# Altium PCB STM32C0_ST25R100_EVK.PcbDoc
Units mm, origin at the board's own origin, x right, y up, seen from the top; angles counter-clockwise.
Board outline 89.92 x 31.24 mm, 2 copper layers (Top Layer, Bottom Layer); 84 components, 80 nets, 289 pads, 224 vias.
Unrouted connection lines stored in the file: 1.
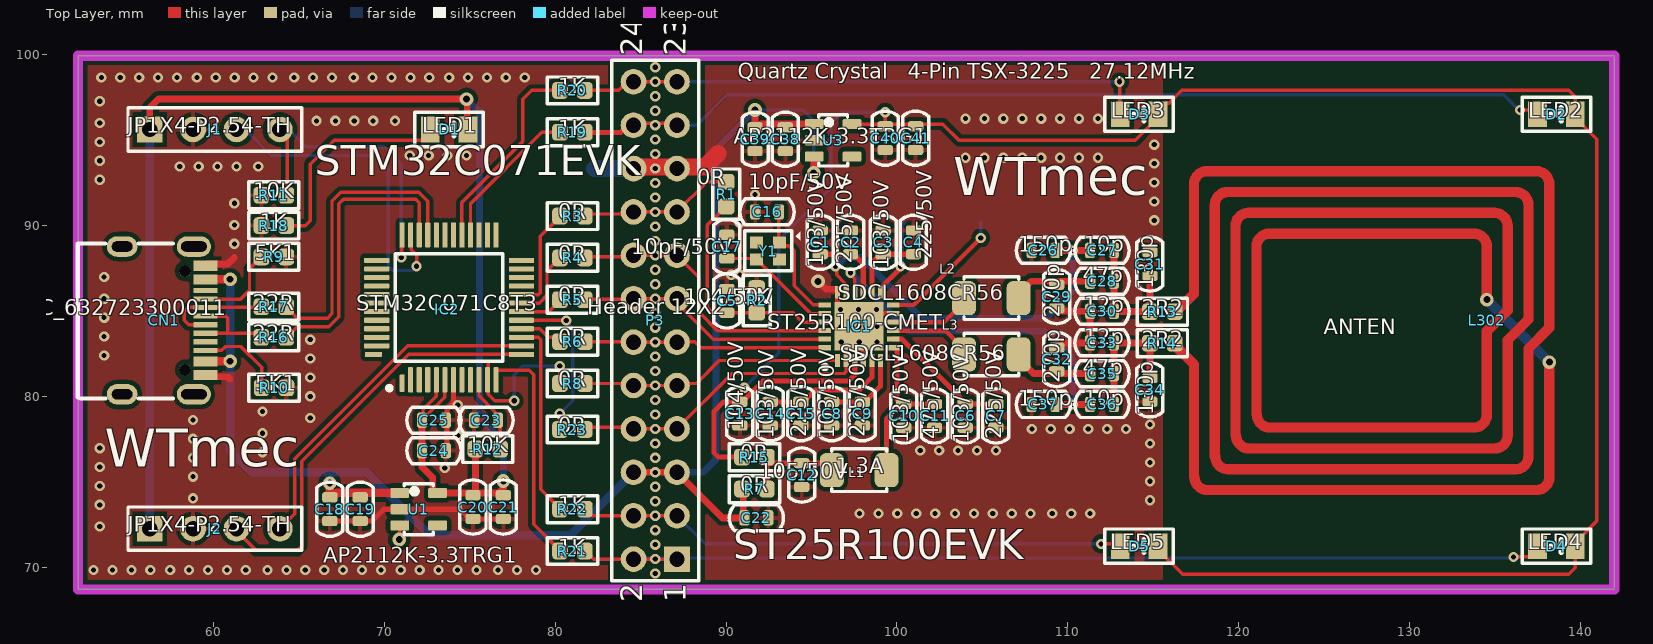
[diagram p0: Top Layer view]
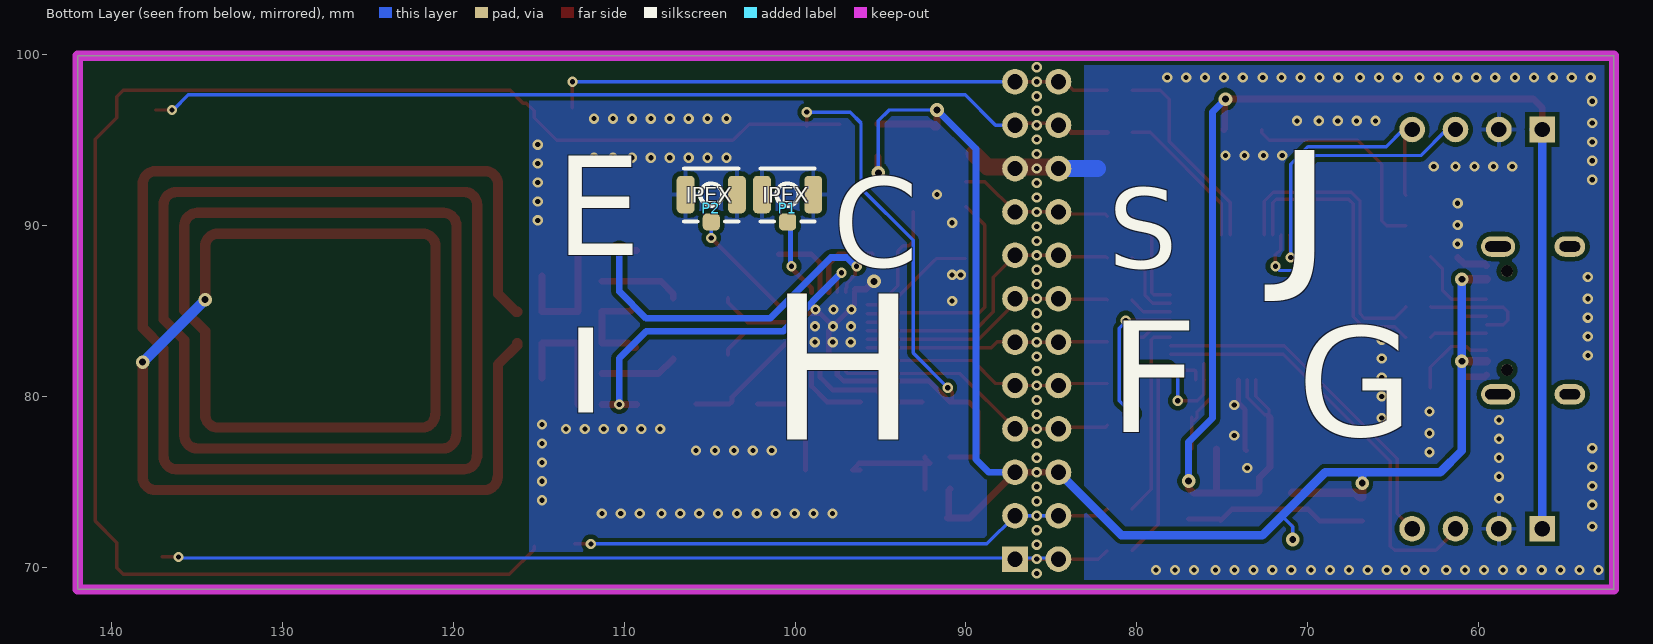
[diagram p1: Bottom Layer view, seen from below]
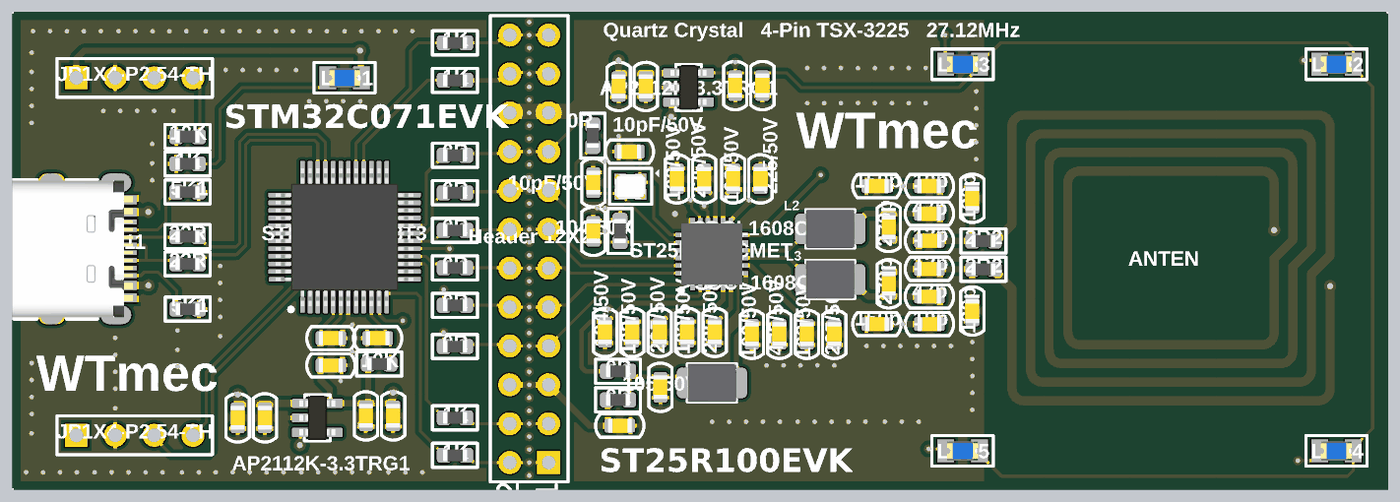
[diagram p2: 3D render of the assembled board from above, using the file's embedded part models]

## Layer stack, top to bottom
Top Solder: solder mask 0.0102, Solder Resist, Dk 3.5
Top Layer: signal copper 0.0356
Dielectric 1: dielectric 0.32, FR-4, Dk 4.8
Bottom Layer: signal copper 0.0356
Bottom Solder: solder mask 0.0102, Solder Resist, Dk 3.5

## Board outline
52.07,68.707 141.986,68.707 141.986,99.949 52.07,99.949

## Design rules (kind name [scope] priority, off if disabled: settings)
Clearance [All] p1: gap=0.254 ignorepadtopadclearanceinfootprint=FALSE except(0: Arc-Hole Track-Hole SMDPad-Hole THPad-Hole Via-Hole Fill-Hole Poly-Hole Region-Hole Text-Hole; 0.2: Arc-Arc Arc-Track Arc-SMDPad Track-Track Track-SMDPad)
PolygonConnect [All] p1: thpad.connectstyle=Relief thpad.reliefconductorwidth=0.254 thpad.reliefentries=4 thpad.polygonreliefangle="90 Angle" thpad.airgapwidth=0.254 smdpad.connectstyle=Relief smdpad.reliefconductorwidth=0.254 smdpad.reliefentries=4 smdpad.polygonreliefangle="90 Angle" smdpad.airgapwidth=0.254 via.connectstyle=Direct via.reliefconductorwidth=0.254 via.reliefentries=4 via.polygonreliefangle="90 Angle" via.airgapwidth=0.254
RoutingVias [All] p1: holewidth=0.711 width=1.27 viastyle="Through Hole" minholewidth=0.711 minwidth=1.27 maxholewidth=0.711 maxwidth=1.27
SolderMaskExpansion [All] p1: expansion=0.102 istentingtop=FALSE
Width [All] p1: maxlimit=2 minlimit=0.2 preferedwidth=0.254
30 further rules are at their usual default settings.

## Classes and differential pairs
component class Reader: C1 C2 C3 C4 C5 C6 C7 C8 C9 C10 C11 C12 C13 C14 C15 C16 C17 C38 C39 C40 C41 IC1 IP IP1 L1 P1 P2 R1 R2 R7 R15 U2 U3 Y1
component class MCU: C18 C19 C20 C21 C22 C23 C24 C25 CN1 D1 D2 D3 D4 D5 IC2 J1 J2 P3 R3 R4 R5 R6 R8 R9 R10 R11 R12 R16 R17 R18 R19 R20 R21 R22 R23 U1 U2
component class ANT: C26 C27 C28 C29 C30 C31 C32 C33 C34 C35 C36 C37 con1 L2 L3 R13 R14

## Components (designator, comment, footprint, x,y, rotation, side; value= is the part's Value field where it differs from the comment)
C1 "103/50V" CAP_CERAMIC_0603(1608mm) 95.504,89.027 r270 top value=33p
C2 "225/50V" CAP_CERAMIC_0603(1608mm) 97.282,89.027 r270 top value=33p
C3 "103/50V" CAP_CERAMIC_0603(1608mm) 99.187,89.027 r270 top value=33p
C4 "225/50V" CAP_CERAMIC_0603(1608mm) 100.965,89.027 r270 top value=33p
C5 "104/50V" CAP_CERAMIC_0603(1608mm) 90.043,85.598 r90 top value=33p
C6 "103/50V" CAP_CERAMIC_0603(1608mm) 103.995,78.867 r90 top value=33p
C7 "225/50V" CAP_CERAMIC_0603(1608mm) 105.791,78.867 r90 top value=33p
C8 "103/50V" CAP_CERAMIC_0603(1608mm) 96.175,78.994 r90 top value=33p
C9 "225/50V" CAP_CERAMIC_0603(1608mm) 97.971,78.994 r90 top value=33p
C10 "103/50V" CAP_CERAMIC_0603(1608mm) 100.403,78.867 r90 top value=33p
C11 "475/50V" CAP_CERAMIC_0603(1608mm) 102.199,78.867 r90 top value=33p
C12 "105/50V" CAP_CERAMIC_0603(1608mm) 94.426,75.404 r90 top value=33p
C13 "104/50V" CAP_CERAMIC_0603(1608mm) 90.805,78.994 r90 top value=33p
C14 "103/50V" CAP_CERAMIC_0603(1608mm) 92.583,78.994 r90 top value=33p
C15 "225/50V" CAP_CERAMIC_0603(1608mm) 94.379,78.994 r90 top value=33p
C16 "10pF/50V" CAP_CERAMIC_0603(1608mm) 92.396,90.805 r180 top
C17 "10pF/50V" CAP_CERAMIC_0603(1608mm) 90.043,88.773 r90 top
C18 "Capacitor" CAP_CERAMIC_0603(1608mm) 66.802,73.406 r90 top value=100pF
C19 "Capacitor" CAP_CERAMIC_0603(1608mm) 68.58,73.406 r90 top value=100pF
C20 "Capacitor" CAP_CERAMIC_0603(1608mm) 75.184,73.533 r90 top value=100pF
C21 "Capacitor" CAP_CERAMIC_0603(1608mm) 76.962,73.533 r90 top value=100pF
C22 "Capacitor" CAP_CERAMIC_0603(1608mm) 91.769,72.898 r0 top value=100pF
C23 "Capacitor" CAP_CERAMIC_0603(1608mm) 75.946,78.613 r0 top value=100pF
C24 "Capacitor" CAP_CERAMIC_0603(1608mm) 72.898,76.835 r180 top value=100pF
C25 "Capacitor" CAP_CERAMIC_0603(1608mm) 72.898,78.613 r180 top value=100pF
C26 "150p" CAP_CERAMIC_0603(1608mm) 108.573,88.553 r180 top
C27 "10p" CAP_CERAMIC_0603(1608mm) 112.002,88.553 r180 top
C28 "47p" CAP_CERAMIC_0603(1608mm) 112.002,86.75 r180 top
C29 "270p" CAP_CERAMIC_0603(1608mm) 109.347,85.852 r90 top
C30 "12p" CAP_CERAMIC_0603(1608mm) 112.002,84.988 r0 top
C31 "130p" CAP_CERAMIC_0603(1608mm) 114.808,87.757 r270 top
C32 "270p" CAP_CERAMIC_0603(1608mm) 109.347,82.169 r90 top
C33 "12p" CAP_CERAMIC_0603(1608mm) 112.002,83.143 r180 top
C34 "130p" CAP_CERAMIC_0603(1608mm) 114.808,80.391 r270 top
C35 "47p" CAP_CERAMIC_0603(1608mm) 112.002,81.34 r180 top
C36 "10p" CAP_CERAMIC_0603(1608mm) 112.002,79.536 r0 top
C37 "150p" CAP_CERAMIC_0603(1608mm) 108.573,79.536 r0 top
C38 "Capacitor" CAP_CERAMIC_0603(1608mm) 93.472,95.063 r90 top value=100pF
C39 "Capacitor" CAP_CERAMIC_0603(1608mm) 91.694,95.063 r90 top value=100pF
C40 "Capacitor" CAP_CERAMIC_0603(1608mm) 99.314,95.123 r90 top value=100pF
C41 "Capacitor" CAP_CERAMIC_0603(1608mm) 101.092,95.123 r90 top value=100pF
CN1 "USB_C_632723300011" USB-C-SMD_TYPE-C-6PIN-2MD-073 57.023,84.455 r270 top locked
D1 "LED1" LED_0805_BLUE 73.787,95.631 r180 top
D2 "LED2" LED_0805_BLUE 138.6,96.52 r180 top
D3 "LED3" LED_0805_BLUE 114.173,96.52 r180 top
D4 "LED4" LED_0805_BLUE 138.6,71.247 r180 top
D5 "LED5" LED_0805_BLUE 114.173,71.247 r180 top
IC1 "ST25R100-CMET" QFN50P400X400X60-25N-D 97.778,84.108 r90 top locked
IC2 "STM32C071C8T3" QFP50P900X900X160-48N 73.787,85.217 r90 top locked
J1 "JP1X4-P2.54-TH" HDR1X4 56.261,95.631 r0 top locked
J2 "JP1X4-P2.54-TH" HDR1X4 56.261,72.263 r0 top locked
L1 "1.3A" "Inductor 1210 (3225)" 97.79,75.692 r180 top value="120 Ohms @ 100 MHz"
L2 "SDCL1608CR56" "Inductor 1210 (3225)" 105.525,85.759 r180 top value=560nH
L3 "SDCL1608CR56" "Inductor 1210 (3225)" 105.525,82.457 r180 top value=560nH
L302 "ANTEN" "PCB ANTEN RFID, 13.56MHZ, 420NH, 20X20 MM" 134.529,84.474 r270 top value=420nH
P1 "IPEX" "IPEX SMD" 100.428,90.242 r270 bottom value=IPEX_GPS
P2 "IPEX" "IPEX SMD" 104.897,90.242 r270 bottom value=IPEX_GPS
P3 "Header 12X2" HDR2X12 87.122,70.485 r90 top locked
R1 "0R" RES_0603(1608) 90.17,91.948 r270 top
R2 "1K" RES_0603(1608) 91.948,85.725 r270 top
R3 "0R" RES_0603(1608) 80.899,90.726 r0 top
R4 "0R" RES_0603(1608) 80.899,88.275 r0 top
R5 "0R" RES_0603(1608) 80.899,85.825 r0 top
R6 "0R" RES_0603(1608) 80.899,83.374 r0 top
R7 "0R" RES_0603(1608) 91.759,74.422 r180 top
R8 "0R" RES_0603(1608) 80.899,80.923 r0 top
R9 "5K1" RES_0603(1608) 63.627,88.011 r180 top
R10 "5K1" RES_0603(1608) 63.639,80.357 r180 top
R11 "10K" RES_0603(1608) 63.424,91.948 r0 top
R12 "10K" RES_0603(1608) 75.946,77.089 r0 top
R13 "2R2" RES_0603(1608) 115.431,85.124 r0 top
R14 "2R2" RES_0603(1608) 115.431,83.279 r0 top
R15 "0R" RES_0603(1608) 91.759,76.293 r180 top
R16 "22R" RES_0603(1608) 63.627,83.312 r180 top value=5K1
R17 "22R" RES_0603(1608) 63.627,85.09 r180 top value=5K1
R18 "1K" RES_0603(1608) 63.424,90.17 r0 top
R19 "1K" RES_0603(1608) 80.899,95.628 r0 top
R20 "1K" RES_0603(1608) 80.899,98.078 r0 top
R21 "1K" RES_0603(1608) 80.899,71.12 r0 top
R22 "1K" RES_0603(1608) 80.899,73.571 r0 top
R23 "0R" RES_0603(1608) 80.899,78.232 r0 top
U1 "AP2112K-3.3TRG1" SOT23-5 72.009,73.406 r270 top
U3 "AP2112K-3.3TRG1" SOT23-5 96.266,94.996 r270 top
Y1 "Quartz Crystal   4-Pin TSX-3225   27.12MHz" "CRYSTAL-XRCGB27M120F3M10R0 (2x1.6)" 92.456,88.519 r180 top value=27.12MHz

## Footprints (in the part's own frame and the unit in brackets; to place one, negate y for a bottom-side part, rotate by r counter-clockwise, add the part's x,y. Pads: shape width x height; smd on the part's side, far side on the other; paste and mask are expansions set on the pad)
CAP_CERAMIC_0603(1608mm) [mm] "Chip Capacitor, Body 1.6x0.8mm, IPC High Density"
  rrect49% 0.6x0.9 smd: 1(-0.695,0) 2(0.695,0)
  silkscreen extent -1.59,-0.76 1.59,0.76, body extent -0.79,-0.47 0.81,0.48, height 0.81
"CRYSTAL-XRCGB27M120F3M10R0 (2x1.6)" [mm] "Crystal 2x1.6mm"
  rect 0.75x0.7 smd: 1(-0.675,-0.5) 2(0.675,-0.5) 3(0.675,0.5) 4(-0.675,0.5)
  silkscreen extent -1.88,-1.19 1.36,1.15, body extent -1,-0.8 1,0.8, height 0.65
HDR1X4 [mm] "Connector; Header; 4 Position"
  rect 1.5x1.5 hole 0.9: 1(0,0)
  round 1.5 hole 0.9: 2(2.54,0) 3(5.08,0) 4(7.62,0)
  silkscreen extent -1.27,-1.27 8.89,1.27
HDR2X12 [mm] "Connector; Header; 12x2 Position"
  rect 1.5x1.5 hole 0.9: 1(0,0)
  round 1.5 hole 0.9: 2(0,2.54) 3(2.54,0) 4(2.54,2.54) 5(5.08,0) 6(5.08,2.54) 7(7.62,0) 8(7.62,2.54) 9(10.16,0) 10(10.16,2.54) 11(12.7,0) 12(12.7,2.54) 13(15.24,0) 14(15.24,2.54) 15(17.78,0) 16(17.78,2.54) 17(20.32,0) 18(20.32,2.54) 19(22.86,0) 20(22.86,2.54) 21(25.4,0) 22(25.4,2.54) 23(27.94,0) 24(27.94,2.54)
  silkscreen extent -1.27,-1.27 29.21,3.81
"Inductor 1210 (3225)" [mm]
  rrect50% 1.4x2 smd: 1(-1.6,0) 2(1.6,0)
  silkscreen extent -1.6,-1.25 1.6,1.25, body extent -1.6,-1.25 1.6,1.25, height 1.91
"IPEX SMD" [mm] "IPEX Connector SMD"
  round 0.5 on Bottom Overlay: 1(-1.579,-0.005)
  rrect50% 1x1 smd: 1(0.021,-0.005)
  rrect50% 2.2x1.05 smd: 2(-1.579,1.495) 3(-1.579,-1.505)
  silkscreen extent -3.1,-1.58 0,1.57, body extent -3.09,-1.51 0.01,1.49, height 1.25
LED_0805_BLUE [mm] "Chip Resistor; Body 2.0 x 1.3 mm (LxW typ)"
  rect 1.1x1.5 smd: 1(-1.1,0) 2(1.1,0)
  silkscreen extent -2,-1 2,1, body extent -1.01,-0.63 1.01,0.63, height 1.1
"PCB ANTEN RFID, 13.56MHZ, 420NH, 20X20 MM" [mm] "PCB Anten RFID, 13.56MHz, 420nH, 20x20 mm"
  Top Layer lines w0.6: 1.357,-18.271 1.469,-18.271 2.595,-17.145 9.188,-17.145 ; -0.489,-18.271 -0.489,-18.197 -1.541,-17.145 -7.956,-17.145 cw(c-7.956,-16.383) -8.718,-16.383 ; 9.188,-17.117 ccw(c9.188,-16.354) 9.951,-16.358 ; 9.951,-16.361 ccw(c9.189,-16.358) 9.951,-16.358 ; -8.718,-16.3 -8.718,2.896 ; 7.969,-15.926 -6.737,-15.926 cw(c-6.737,-15.164) -7.499,-15.167 ; 7.969,-15.9 ccw(c7.969,-15.138) 8.731,-15.141 ; 6.75,-14.707 -5.518,-14.707 cw(c-5.518,-13.945) -6.28,-13.948 ; 6.75,-14.681 ccw(c6.75,-13.919) 7.512,-13.922 ; 5.531,-13.487 -4.299,-13.487 cw(c-4.299,-12.725) -5.061,-12.725 ; 5.531,-13.462 ccw(c5.531,-12.7) 6.293,-12.703 ; -5.061,-12.8 -5.061,-12.725 ; 6.293,-0.737 6.293,-0.762 ; -1.2,0 -4.248,0 ; -4.299,0 ccw(c-4.299,-0.762) -5.061,-0.762 -5.061,-12.725 ; 7.512,0.483 7.512,0.457 ; 6.75,1.219 cw(c6.75,0.457) 7.512,0.457 ; 6.6,1.219 1.162,1.219 -0.057,2.438 -6.661,2.438 ; -5.391,1.219 -0.565,1.219 0.654,0 5.531,0 cw(c5.531,-0.762) 6.293,-0.762 ; -5.493,1.219 ccw(c-5.493,0.432) -6.28,0.432 -6.28,-13.945 ; 8.731,1.702 8.731,1.676 ; 7.969,2.438 cw(c7.969,1.676) 8.731,1.676 ; 7.944,2.438 1.67,2.438 0.451,3.658 -7.931,3.658 ; -6.737,2.438 ccw(c-6.737,1.676) -7.499,1.676 -7.499,-15.164 ; 9.951,2.921 9.951,2.896 ; 9.214,3.658 9.189,3.658 ; 2.458,3.658 9.189,3.658 ; -7.956,3.658 ccw(c-7.956,2.896) -8.718,2.896 ; 9.951,-16.358 9.951,-16.358 ; 9.951,-16.358 9.951,-16.358 ; 9.951,-16.358 9.951,-16.358 ; 9.951,-16.358 9.951,-16.358 ; 9.951,-16.358 9.951,-16.358 ; 9.951,-16.358 9.951,-16.358 ; 9.951,-16.358 9.951,-16.358 ; 9.951,-16.358 9.951,-16.358 ; 9.951,-16.358 9.951,-16.358 ; 9.951,-16.358 9.951,2.896 ; -7.499,-15.167 cw(c-6.737,-15.164) -7.499,-15.164 ; -7.499,-15.167 -7.499,-15.164 ; 8.731,-15.141 ccw(c7.969,-15.138) 8.731,-15.138 ; 8.731,-15.141 8.731,-15.138 ; 8.731,-15.138 8.731,1.676 ; -6.28,-13.948 cw(c-5.518,-13.945) -6.28,-13.945 ; -6.28,-13.948 -6.28,-13.945 ; 7.512,-13.922 ccw(c6.75,-13.919) 7.512,-13.919 ; 7.512,-13.922 7.512,-13.919 ; 7.512,-13.919 7.512,0.457 ; 6.293,-12.703 ccw(c5.531,-12.7) 6.293,-12.7 ; 6.293,-12.703 6.293,-12.7 ; 6.293,-12.7 6.293,-0.762 ; 9.951,2.896 ccw(c9.189,2.896) 9.189,3.658 ; -8.718,2.896 -8.718,2.896
  Bottom Layer lines w0.6: -1.2,0 2.458,3.658
QFN50P400X400X60-25N-D [mm]
  rect 0.75x0.3 smd: 1(-2,1.25) 2(-2,0.75) 3(-2,0.25) 4(-2,-0.25) 5(-2,-0.75) 6(-2,-1.25) 13(2,-1.25) 14(2,-0.75) 15(2,-0.25) 16(2,0.25) 17(2,0.75) 18(2,1.25)
  rect 0.3x0.75 smd: 7(-1.25,-2) 8(-0.75,-2) 9(-0.25,-2) 10(0.25,-2) 11(0.75,-2) 12(1.25,-2) 19(1.25,2) 20(0.75,2) 21(0.25,2) 22(-0.25,2) 23(-0.75,2) 24(-1.25,2)
  rect 2.85x2.85 smd: 25(0,0)
  silkscreen extent -2.5,1.88 -2.25,2.12, body extent -2.05,-2.05 2.05,2.05, height 0.6
QFP50P900X900X160-48N [mm]
  rrect30% 1x0.3 smd: 1(-4.438,2.75)
  rrect30% 1.475x0.3 smd: 2(-4.238,2.25) 3(-4.238,1.75) 4(-4.238,1.25) 5(-4.238,0.75) 6(-4.238,0.25) 7(-4.238,-0.25) 8(-4.238,-0.75) 9(-4.238,-1.25) 10(-4.238,-1.75) 11(-4.238,-2.25) 12(-4.238,-2.75) 25(4.238,-2.75) 26(4.238,-2.25) 27(4.238,-1.75) 28(4.238,-1.25) 29(4.238,-0.75) 30(4.238,-0.25) 31(4.238,0.25) 32(4.238,0.75) 33(4.238,1.25) 34(4.238,1.75) 35(4.238,2.25) 36(4.238,2.75)
  rrect30% 0.3x1.475 smd: 13(-2.75,-4.238) 14(-2.25,-4.238) 15(-1.75,-4.238) 16(-1.25,-4.238) 17(-0.75,-4.238) 18(-0.25,-4.238) 19(0.25,-4.238) 20(0.75,-4.238) 21(1.25,-4.238) 22(1.75,-4.238) 23(2.25,-4.238) 24(2.75,-4.238) 37(2.75,4.238) 38(2.25,4.238) 39(1.75,4.238) 40(1.25,4.238) 41(0.75,4.238) 42(0.25,4.238) 43(-0.25,4.238) 44(-0.75,4.238) 45(-1.25,4.238) 46(-1.75,4.238) 47(-2.25,4.238)
  rrect30% 0.3x1 smd: 48(-2.75,4.438)
  silkscreen extent -4.85,-3.15 3.15,3.62, body extent -4.5,-4.5 4.5,4.5, height 1.41
RES_0603(1608) [mm] "Chip Inductor, Body 0.6x0.3mm, IPC High Density"
  rrect50% 0.92x0.98 smd: 1(-0.623,-0.161) 2(0.827,-0.161)
  silkscreen extent -1.37,-0.95 1.57,0.63, body extent -0.7,-0.56 0.9,0.24, height 0.56
SOT23-5 [mm]
  rrect30% 0.6x1.1 smd: 1(-0.95,-1.11) 2(0,-1.11) 3(0.95,-1.11) 4(0.95,1.1) 5(-0.95,1.1)
  silkscreen extent -1.5,-0.85 1.5,0.85, body extent -1.46,-1.17 1.46,1.17, height 1
USB-C-SMD_TYPE-C-6PIN-2MD-073 [mm]
  rect 0.6x1.4 smd: 1(-3.2,2.502) 2(-2.4,2.502) 11(2.4,2.502) 12(3.2,2.502)
  rect 0.3x1.4 smd: 3(-1.75,2.502) 4(-1.25,2.502) 5(-0.75,2.502) 6(-0.25,2.502) 7(0.25,2.502) 8(0.75,2.502) 9(1.25,2.502) 10(1.75,2.502)
  oval 1.2x2 hole 0.6 slot 1.5 at 90 deg: 13(-4.325,1.825) 14(4.325,1.825)
  oval 1.2x1.8 hole 0.6 slot 1.2 at 90 deg: 13(-4.325,-2.375) 14(4.325,-2.375)
  round 0.7 hole 0.7 unplated: ""(-2.89,1.305) ""(2.89,1.305)
  silkscreen extent -4.5,-4.97 4.57,0.6, body extent -4.47,-4.95 4.48,2.95, height 3.16

## Part data
C1 C2 C3 C4 C5 C6 C7 C8 C9 C10 C11 C12 C13 C14 C15 C26 C27 C28 C29 C30 C31 C32 C33 C34 C35 C36 C37: library part C0603, "Capacitor Ceramic SMD 0603(1608)"
  C1 C2 C3 C4 C5 C6 C7 C8 C9 C10 C11 C12 C13 C14 C15: LatestRevisionDate=17-Jul-2002, LatestRevisionNote="Re-released for DXP Platform.", PackageReference=RAD-0.3, Published=8-Jun-2000, Publisher="Altium Limited"
  C26 C27 C28 C29 C30 C31 C32 C33 C34 C35 C36 C37: PackageReference=0603
C16 C17: library part CC0603JRNPO9BN100, "CAP CER 10PF 50V 5% COG/NPO 0603", MFR=TDK, Package=0603, Part Number=CC0603JRNPO9BN100, SOLD=SMT
C18 C19 C20 C21 C22 C23 C24 C25 C38 C39 C40 C41: library part MCD-00205, "Capacitor, MLCC, 100pF, 50V, NPO, +/-5%, 0402, T=0.5mm", Manufacturer=YAGEO, Manufacturer_Part_Number=CC0402JRNPO9BN101, Package=0402, Component_Country_Of_Origin=China, ComponentLink1URL=http://tunmcdsvn.tun.st.com/Component_Documentation_Library/Trunk/Capacitor/YAGEO_NP0_Series, ID=2658, Internal_Part_Number=MCD-00205, Order_Code_Digikey=311-1024-1-ND, Order_Code_Farnell=3019226RL, Order_Code_RS=N/A, Part_Preference=Recommended, Part_Type=Capacitor, ShowFields=YES, Status=Released
CN1: library part MCD-02273, "Connector_USB_TypeC, 24pins, RA, TH, T=1.9mm (USB certified)", Manufacturer="WURTH ELEKTRONIK", Manufacturer_Part_Number=632723300011, Component_Country_Of_Origin=China, ComponentLink1URL=http://tunmcdsvn.tun.st.com/Component_Datasheet_Library/Trunk/Connectors/WURTH_ELEKTRONIK_USB_TYPE-C_632723300011, ID=4373, Internal_Part_Number=MCD-02273, Order_Code_Digikey=732-9618-1-ND, Order_Code_Farnell=2984404, Order_Code_RS=N/A, Part_Preference=Recommended, Part_Type=Connector, ShowFields=YES, Status=Released
D1: library part LED_Gr, "LED 0805 GREEN 6.3MCD GAP ON GAP", Package=0805
D2 D3 D4 D5: library part LED_BLUE, "LED 3MM HI EFF BLUE DIFF", MFR="Vishay Semiconductor Opto Division", Package=Pitch:3mm, Part Number=TLHB4400, Vender=Digikey, Vender Part=751-1092-ND
IC1: "Integrated Circuit", Manufacturer_Name=STMicroelectronics, Mouser Part Number=511-ST25R100-CMET, Datasheet Link=https://www.st.com/resource/en/datasheet/st25r100.pdf, Height=0.6mm, Manufacturer_Part_Number=ST25R100-CMET, Mouser Price/Stock=https://www.mouser.co.uk/ProductDetail/STMicroelectronics/ST25R100-CMET?qs=HoCaDK9Nz5cyKRkjt%2FIQ%2Fw%3D%3D
IC2: "Integrated Circuit", Manufacturer_Name=STMicroelectronics, Datasheet Link=https://www.st.com/resource/en/datasheet/stm32c071c8.pdf, Height=1.6mm, Manufacturer_Part_Number=STM32C071C8T3
J1 J2: "Pin Header Single Row 2.54MM 4P - Through Hole"
L1: library part IND, "IND-FIXED 0603", MPN=BLM15PD121SN1D, Solder=SMT
L2 L3: library part "L 0603 100n", "SMD 0603   Multilayer High frequency Inductor   560 nH   100 mA   1 Ω Max   (Ex SDCL1608CR56JTDF...)", Manufacturer="Shenzhen Sunlord Electronics Co., Ltd", Package=0603, Package-mm=1608, PartNumber="SDCL1608CR56JTDF, SWEL1608CR56JT", Temperature Range="-55°C ~ +125°C", Tolerance %=±5%, ComponentLink1Description="Datasheet link", ComponentLink1URL=https://store.comet.bg/download-file.php?id=1927, DCR=1Ω, Imax=300mA, Ind=560nH, Material=Ferrite, Mount Type=SMT, Publisher=Hefest, Q@100MHz=65, S.R.F.=1400MHz, Supplier 1=Comet, Technology=Chip, Type=Inductors
L302: library part Inductor, "Inductor", Code_IEC=1005, Code_JEITA=0402, LatestRevisionDate=29-May-2009, LatestRevisionNote="IPC-7351 Footprint Added.", PackageDescription="Chip Inductor", PackageReference=0402-A, Published=8-Jun-2000, Publisher="Altium Limited"
P1 P2: library part LTI-IPXSM66AL, "IPX/U.FL Surface Mount Mating Receptacle", CompanyID=VT-01357, MPN=LTI-IPXSM66AL, Solder=SMT
P3: "Header, 12-Pin, Dual row", LatestRevisionDate=17-Jul-2002, LatestRevisionNote="Re-released for DXP Platform.", Publisher="Altium Limited"
R1 R3 R4 R5 R6 R7 R8 R9 R10 R11 R12 R13 R14 R15 R16 R17 R23: library part R0603, "Resistor SMD 0603(1608)", MPN=RC0603FR-070RL, Package=0603
R2 R18 R19 R20 R21 R22: library part RC0603FR-0710KL, "RES SMD 10K OHM 1% 1/10W 0603", MPN=RC0603FR-0710KL, Solder=SMT
U1 U3: "IC REG LDO 3.3V 0.6A SOT25", CompanyID=VT-01101, MPN=AP2112K-3.3TRG1, Solder=SMT
Y1: library part 2SMX, "Quartz Crystal   4-Pin SMD 3.2x2.5 mm   27.12 MHz", PackageDocument=9-Sep-1999, ComponentLink1Description="Manufacturer Link", ComponentLink1URL=http://www.cmac.com/mt/, DatasheetDocument=9-Sep-1999, Note="PCB layout complies with manufacturer's recommendation.", PackageReference=2SMX, Published=17-Jul-2002, Publisher="Altium Limited", Type=Crystal

## Via types
v1: diameter 0.6, hole 0.3, Top Layer to Bottom Layer, 213 vias
v2: diameter 0.8, hole 0.4, Top Layer to Bottom Layer, 9 vias
v3: diameter 0.8, hole 0.4, Top Layer to Bottom Layer, tented both sides, 2 vias

## Nets (pads, with @x,y where several pads share a name; then routed paths per layer and width w, separated by ;. In a path a pad name is that pad's centre, name@x,y a point inside that pad or via, vN(x,y) a via of type N, cw(c..) or ccw(c..) an arc to the next point about the centre after c; other vN are vias at no path point)
+3V3: C20.2 C21.2 C24.2 C25.2 D1.1 IC2.5 IC2.6 J1.1 J2.1 R12.1 U1.5 | length 85.6
  Top Layer w0.2: C25.2@72.26,78.836 72.26,79.245 73.037,80.022 IC2.5 ; C25.2@72.399,78.934 72.514,78.934 73.537,79.957 IC2.6
  Top Layer w0.4: J1.1 56.261,96.901 56.769,97.409 v2(74.803,97.409) 74.845,97.367 74.845,95.673 D1.1 ; C25.2@72.26,78.836 72.203,78.779 C25.2 C24.2 72.203,75.879 72.826,75.256 72.826,74.456 72.926,74.356 U1.5 ; U1.5@73.173,74.356 C20.2@75.323,74.356 ; R12.1 C20.2@75.323,74.356 ; v2(76.962,75.057) 76.962,74.642 76.676,74.356 C20.2@75.323,74.356
  Bottom Layer w0.4: v2(74.803,97.409) 75.565,96.647 75.565,78.74 76.962,77.343 v2(76.962,75.057)
  Bottom Layer w0.5: J2.1 56.261,95.123 J1.1@56.769,95.631
+3V3RF: C13.2 C40.2 C41.2 D2.1 D3.1 D4.1 D5.1 IC1.3 R15.2 U3.5 | length 135.3
  Top Layer w0.2: C13.2 90.805,80.246 91.059,80.5 v1(91.059,80.518) ; U3.5 C40.2@99.314,95.946 ; C40.2 C40.2@99.314,95.946 ; v1(99.314,96.647) C40.2@99.314,95.946 ; D5.1 115.273,71.047 116.724,69.596 139.319,69.596 139.7,69.977 D4.1 139.7,71.447 140.97,72.717 140.97,95.05 139.7,96.32 D2.1 139.7,97.536 139.319,97.917 116.67,97.917 115.923,97.17 115.723,97.17 115.273,96.72 D3.1 115.273,96.32 113.949,94.996 103.632,94.996 102.682,95.946 101.092,95.946 C40.2@99.314,95.946
  Top Layer w0.3: R15.2 89.535,76.454 89.281,76.708 89.281,79.121 89.849,79.689 C13.2 90.955,79.689 92.165,80.899 97.155,80.899 97.528,81.272 IC1.3
  Bottom Layer w0.2: v1(91.059,80.518) 93.091,82.55 93.091,89.154 96.139,92.202 96.139,96.012 96.774,96.647 v1(99.314,96.647)
+5V0: C18.2 C19.2 C22.1 C38.2 C39.2 CN1.2 CN1.11 P3.5 P3.6 R7.2 U1.1 U1.3 U3.1 U3.3 | length 93.4
  Top Layer w0.2: v2@70.899,71.788 U1.3
  Top Layer w0.3: v2@60.82,86.855 60.833,86.868 60.962,86.868 v2(60.966,86.864)
  Top Layer w0.4: P3.6 P3.5 89.789,72.898 C22.1 91.003,72.969 91.003,74.512 R7.2 ; v2(91.694,96.774) C39.2 91.844,95.758 92.032,95.946 U3.1 ; v2(95.123,93.091) 95.139,93.107 95.139,94.029 U3.3
  Top Layer w0.5: CN1.11 v2@60.82,82.055 ; CN1.2 v2@60.82,86.855 ; v2(66.802,74.93) C18.2 66.952,74.101 67.207,74.356 U1.1
  Bottom Layer w0.2: v2(70.866,71.628) 70.866,72.39 71.501,73.025 ; v2(91.694,96.774) 94.488,96.774 95.123,96.139 v2(95.123,93.091)
  Bottom Layer w0.4: P3.5 88.646,75.565 89.408,76.327 89.408,94.488 v2@91.567,96.647
  Bottom Layer w0.5: v2(60.966,86.864) v2(60.966,82.064) 60.966,76.835 62.236,75.565 66.802,75.565 ; v2(66.802,74.93) 66.802,75.565 ; P3.6 80.899,71.882 72.644,71.882 71.501,73.025 68.961,75.565 66.802,75.565
  other v1: 85.852,75.565
AGD: C1.2 C2.2 IC1.15 | length 4.4
  Top Layer w0.3: C1.2 C2.2 97.453,88.332 98.028,87.757 IC1.15
CNL1: D2.2 P3.21 P3.22 R19.2 | length 56.9
  Top Layer w0.2: P3.22@84.582,95.995 87.012,95.995 P3.21 ; v1(136.463,96.774) D2.2@137.414,96.774
  Top Layer w0.3: R19.2 83.839,95.466 84.257,95.885 P3.22
  Bottom Layer w0.2: P3.21 88.265,95.885 90.043,97.663 135.509,97.663 v1@136.398,96.774
  other v1: 85.852,95.885
CNL2: D3.2 P3.23 P3.24 R20.2 | length 33
  Top Layer w0.2: R20.2 83.722,97.917 84.23,98.425 P3.24 P3.23 ; D3.2@113.03,96.901 v1(113.03,98.425)
  Bottom Layer w0.2: P3.23 v1(113.03,98.425)
  other v1: 85.852,98.425
CNL3: D4.2 P3.1 P3.2 R21.2 | length 58.1
  Top Layer w0.2: R21.2 81.766,70.959 82.24,70.485 P3.2 P3.1 ; v1(136.082,70.612) D4.2@137.033,70.612
  Bottom Layer w0.2: P3.2 84.645,70.549 136.018,70.549 v1(136.082,70.612)
  other v1: 85.852,70.485
CNL4: D5.2 P3.3 P3.4 R22.2 | length 34.6
  Top Layer w0.2: R22.2 81.766,73.409 82.15,73.025 P3.4 P3.3 ; v1(111.952,71.374) D5.2@112.903,71.374
  Bottom Layer w0.2: P3.4 P3.3 88.773,71.374 v1(111.952,71.374) v1@112.014,71.374
  other v1: 85.852,73.025
GND: C1.1 C2.1 C3.1 C4.1 C5.2 C6.1 C7.1 C8.1 C9.1 C10.1 C11.1 C12.1 C13.1 C14.1 C15.1 C16.2 C17.2 C18.1 C19.1 C20.1 C21.1 C22.2 C23.1 C24.1 C25.1 C26.2 C29.1 C30.1 C31.1 C32.2 C33.2 C34.2 C37.1 C38.1 C39.1 C40.1 C41.1 CN1.1 CN1.12 IC1.4 IC1.11 IC1.18 IC1.25 IC2.7 J1.2 J2.2 P1.2 P1.3 P2.2 P2.3 P3.19 P3.20 R2.1 R9.1 R10.1 R11.1 R18.1 U1.2 U3.2 | length 40.2
  Top Layer w0.3: C18.1 C19.1 69.282,72.711 69.977,73.406 U1.2 74.422,73.406 C20.1@75.087,72.741 ; C24.1 73.66,76.902 73.66,79.248 74.037,79.625 IC2.7 ; C20.1 C21.1 ; IC1.18 96.528,85.358 v1(97.778,84.108) ; IC1.4 98.028,83.858 v1(97.778,84.108) ; IC1.11 98.528,84.858 v1(97.778,84.108)
  Top Layer w0.4: CN1.12 59.619,81.161 60.825,81.161 60.96,81.026 ; CN1.1 59.619,87.749 60.825,87.749 61.214,88.138 ; v2(95.377,86.741) 95.835,86.283 IC1.18@96.478,86.283 ; C32.2 109.497,82.864 109.776,83.143 C33.2 C30.1 109.666,84.988 109.497,85.157 C29.1
  Top Layer w1: P3.20 84.678,93.441 88.742,93.441 89.535,94.234
  Bottom Layer w1: 82.296,93.345 P3.20
  other v1: 52.977,69.85 54.084,69.85 55.191,69.85 56.297,69.85 57.458,69.85 58.565,69.85 59.672,69.85 60.779,69.85 61.885,69.85 63.155,69.85 64.262,69.85 65.369,69.85 66.475,69.85 67.582,69.85 68.689,69.85 69.796,69.85 70.957,69.85 72.063,69.85 73.17,69.85 74.277,69.85 75.384,69.85 76.654,69.85 77.76,69.85 78.867,69.85 53.34,72.39 97.808,73.152 98.915,73.152 100.022,73.152 101.128,73.152 102.235,73.152 103.396,73.152 104.503,73.152 105.61,73.152 106.716,73.152 107.823,73.152 109.093,73.152 110.2,73.152 111.306,73.152 53.34,73.66 114.808,73.932 58.801,74.041 53.34,74.767 114.808,75.039 58.801,75.311 73.533,75.819 53.34,75.873 114.808,76.146 58.801,76.418 62.865,76.744 101.364,76.835 102.471,76.835 103.578,76.835 104.684,76.835 105.791,76.835 53.34,76.98 114.808,77.252 58.801,77.524 74.295,77.724 62.865,77.851 107.896,78.105 109.002,78.105 110.109,78.105 111.198,78.105 112.304,78.105 113.411,78.105 114.808,78.359 58.801,78.631 65.659,78.74 62.865,79.121 74.295,79.502 65.659,80.01 65.659,81.117 65.659,82.223 53.594,82.405 96.738,83.185 97.79,83.185 98.842,83.185 65.659,83.33 53.594,83.512 96.726,84.108 98.831,84.108 53.594,84.618 96.701,85.09 97.754,85.09 98.806,85.09 90.805,85.598 53.594,85.725 53.594,86.995 90.297,87.122 90.805,87.122 61.214,88.936 61.214,90.043 90.805,90.17 115.062,90.315 61.214,91.313 115.062,91.422 91.694,91.821 85.852,92.498 115.062,92.529 53.34,92.692 85.852,93.345 58.021,93.472 59.128,93.472 60.234,93.472 61.341,93.472 62.611,93.472 115.062,93.635 53.34,93.799 104.013,93.98 105.12,93.98 106.226,93.98 107.333,93.98 108.44,93.98 109.547,93.98 110.653,93.98 111.76,93.98 71.483,94.107 72.59,94.107 73.696,94.107 74.803,94.107 85.852,94.192 115.062,94.742 53.34,94.905 53.34,96.012 66.022,96.139 67.129,96.139 68.235,96.139 69.342,96.139 70.612,96.139 104.013,96.266 105.12,96.266 106.226,96.266 107.333,96.266 108.44,96.266 109.547,96.266 110.653,96.266 111.76,96.266 53.34,97.282 53.431,98.679 54.537,98.679 55.644,98.679 56.751,98.679 57.858,98.679 59.019,98.679 60.125,98.679 61.232,98.679 62.339,98.679 63.446,98.679 64.716,98.679 65.822,98.679 66.929,98.679 68.199,98.679 69.306,98.679 70.412,98.679 71.519,98.679 72.626,98.679 73.787,98.679 74.894,98.679 76,98.679 77.107,98.679 78.214,98.679
IRQ: IC1.1 P3.9 P3.10 R8.2 | length 15.4
  Top Layer w0.2: R8.2 P3.10@84.582,80.762 ; P3.10 v1(85.852,80.645) P3.9 ; P3.9@87.122,80.762 88.255,80.762 89.601,82.108 IC1.1
LED1: IC2.28 R19.1 | length 8.8
  Top Layer w0.2: IC2.28 75.037,91.293 79.21,95.466 R19.1
LED2: IC2.29 R20.1 | length 11.8
  Top Layer w0.2: IC2.29 74.537,91.359 78.105,94.927 78.105,97.409 78.613,97.917 R20.1
LED3: IC2.12 R21.1 | length 13.8
  Top Layer w0.2: IC2.12 76.537,81.484 76.587,81.534 78.486,81.534 78.74,81.28 78.74,72.524 80.276,70.989 R21.1
LED4: IC2.15 R22.1 | length 11.6
  Top Layer w0.2: IC2.15 78.994,83.467 79.14,83.321 79.14,74.575 80.276,73.439 R22.1
NetANT_1: R14.2
NetANT_2: R13.2
NetC5_1: C5.1 IC1.21 R1.2 R2.2 | length 13.6
  Top Layer w0.2: R1.2 89.979,91.121 88.9,90.043 88.9,85.217 89.219,84.898 R2.2 93.918,84.898 94.458,84.358 IC1.21
NetC12_2: C12.2 L1.2 R7.1 R15.1 | length 7.1
  Top Layer w0.3: R7.1 R15.1@92.382,76.099 ; R15.1 92.382,76.381 92.108,76.107 92.108,76.099 R15.1@92.382,76.099 ; L1.2 96.647,75.692 96.24,76.099 C12.2 R15.1@92.382,76.099
NetC27_1: C27.1 C28.1 C30.2 C31.2 R13.1 | length 7.8
  Top Layer w0.4: C27.1 C28.1 C30.2 112.71,84.976 114.795,84.976 R13.1 C31.2
NetC28_2: C28.2 C29.2 L2.1 | length 4.7
  Top Layer w0.4: L2.1 107.125,86.016 107.86,86.75 C28.2
NetC32_1: C32.1 C35.2 L3.1 | length 4.5
  Top Layer w0.4: L3.1@107.125,82.203 107.989,81.34 C35.2
NetC33_1: C33.1 C34.1 C35.1 C36.2 R14.1 | length 7.8
  Top Layer w0.4: C36.2 C35.1 C33.1 112.71,83.13 114.795,83.13 R14.1 C34.1
NetCN1_4: CN1.4 R9.2 | length 5
  Top Layer w0.2: CN1.4 61.575,85.705 62.103,86.233 62.103,87.475 R9.2
NetCN1_5: CN1.5 CN1.7 R17.2 | length 6.5
  Top Layer w0.2: CN1.7 58.543,84.205 58.293,84.455 58.293,84.963 58.547,85.217 62.766,85.217 R17.2
NetCN1_6: CN1.6 CN1.8 R16.2 | length 5.6
  Top Layer w0.2: CN1.8 60.833,83.705 ; CN1.6 60.71,84.705 60.833,84.582 60.833,83.705 ; R16.2 62.569,83.705 60.833,83.705
NetCN1_10: CN1.10 R10.2 | length 5.1
  Top Layer w0.2: CN1.10 60.48,82.705 60.706,82.931 61.595,82.931 62.812,81.714 R10.2
NetD1_2: D1.2 R18.2 | length 12.8
  Top Layer w0.2: R18.2 65.371,90.009 65.659,90.297 65.659,93.599 67.056,94.996 72.237,94.996 72.687,95.446 D1.2
NRST: C23.2 IC2.10 R12.2 | length 4.7
  Top Layer w0.2: IC2.10 75.537,80.038 76.47,79.105 76.47,78.784 C23.2 ; R12.2 C23.2@76.773,78.802
PA0: IC2.11 R8.1 | length 8.9
  Top Layer w0.2: 76.073,81.915 76.073,81.015 IC2.11 76.073,80.943 76.073,80.137 76.454,79.756 v1(77.597,79.756) ; v1(80.264,81.788) 80.27,81.782 80.27,80.768 R8.1
  Bottom Layer w0.2: v1(77.597,79.756) 77.597,81.28 78.105,81.788 v1(80.264,81.788)
PA2: IC2.13 J2.3 | length 24.9
  Top Layer w0.2: J2.3 61.341,72.136 62.484,70.993 64.897,70.993 65.151,71.247 65.151,76.2 71.418,82.467 IC2.13
PA3: IC2.14 J2.4 | length 20.5
  Top Layer w0.2: J2.4 64.751,73.133 64.751,76.366 71.352,82.967 IC2.14
PA5: IC2.16 R6.1 | length 2.2
  Top Layer w0.2: IC2.16 79.101,83.967 79.604,83.464 R6.1@80.024,83.464
PA6: IC2.17 R23.1 | length 9.2
  Top Layer w0.2: IC2.17 78.031,84.461 80.639,84.461 v1(80.645,84.455) ; v1(80.264,78.994) 80.27,78.988 80.27,78.317 R23.1@80.276,78.311
  Bottom Layer w0.2: v1(80.264,78.994) 81.026,79.756 81.026,83.987 80.645,84.368 v1(80.645,84.455)
PA7: IC2.18 R5.1 | length 2.6
  Top Layer w0.2: IC2.18 79.609,84.967 80.276,85.633 R5.1
PA10: IC2.32
PA11: IC2.33 R17.1 | length 17.7
  Top Layer w0.2: R17.1 64.25,85.221 64.89,84.582 66.675,84.582 66.929,84.836 66.929,91.44 67.437,91.948 72.009,91.948 72.537,91.42 IC2.33
PA12: IC2.34 R16.1 | length 17
  Top Layer w0.2: R16.1 64.288,83.473 64.889,84.074 66.733,84.074 67.329,84.67 67.329,91.274 67.603,91.548 71.843,91.548 72.037,91.354 IC2.34
PA13: IC2.35 J1.3 | length 18.9
  Top Layer w0.2: IC2.35 71.571,89.421 71.571,88.603 71.882,88.292 v1(71.882,87.63)
  Bottom Layer w0.2: J1.3@61.849,95.631 63.373,94.107 69.596,94.107 70.231,93.472 70.231,87.63 70.485,87.376 71.628,87.376 v1(71.882,87.63)
PA14: IC2.36 J1.4 R11.2 | length 18.2
  Top Layer w0.2: R11.2 64.32,91.856 64.32,95.562 J1.4@64.389,95.631 ; v1(70.985,88.133) 71.011,88.159 71.011,89.429 IC2.36
  Bottom Layer w0.2: J1.4@64.389,95.631 65.405,94.615 69.977,94.615 70.985,93.607 v1(70.985,88.133)
PA15: IC2.37
PB0: IC2.19 R4.1 | length 4.2
  Top Layer w0.2: IC2.19 79.064,85.467 79.516,85.918 79.516,87.354 R4.1
PB1: IC2.20 R3.1 | length 6.1
  Top Layer w0.2: IC2.20 78.998,85.967 79.116,86.084 79.116,89.375 R3.1@80.276,90.535
PB2: IC2.21
PB3: IC2.42
PB4: IC2.43
PB5: IC2.44
PB6: IC2.45
PB7: IC2.46
PB8: IC2.47
PB9: IC2.48
PB10: IC2.22
PB11: IC2.23
PB12: IC2.24
PB13: IC2.25
PB14: IC2.26
PB15: IC2.27
PC6: IC2.30
PC7: IC2.31
PD0: IC2.38
PD1: IC2.39
PD2: IC2.40
PD3: IC2.41
RFI1: C36.1 C37.2 IC1.16 | length 21.1
  Top Layer w0.2: v1(97.282,87.249) 97.282,87.141 97.528,86.894 IC1.16
  Top Layer w0.4: C37.2 v1(110.288,79.536) C36.1
  Bottom Layer w0.4: v1(97.282,87.249) 100.711,83.82 108.712,83.82 110.288,82.244 v1(110.288,79.536)
RFI2: C26.1 C27.2 IC1.17 | length 22.5
  Top Layer w0.2: v1(96.393,87.628) 96.47,87.551 96.47,87.116 96.978,86.608 96.978,86.383 97.028,86.333 IC1.17
  Top Layer w0.4: C26.1 v1(110.288,88.553) C27.2
  Bottom Layer w0.4: v1(96.393,87.628) 96.447,87.628 96.965,88.146 97.909,88.146 101.473,84.582 108.712,84.582 110.288,86.158 v1(110.288,88.553)
RFO1: IC1.9 L3.2 | length 4.9
  Top Layer w0.254: IC1.9 102.832,83.858 103.925,82.765 L3.2
RFO2: IC1.10 L2.2 | length 4.9
  Top Layer w0.254: IC1.10 102.773,84.358 103.925,85.51 L2.2
SPIA_MISO: IC1.2 P3.7 P3.8 R23.2 | length 17.4
  Top Layer w0.2: R23.2@81.726,78.311 81.829,78.208 P3.8@84.582,78.208 ; P3.8 v1(85.852,78.105) P3.7 90.366,81.349 96.911,81.349 97.028,81.466 IC1.2
SPIA_MOSI: IC1.23 P3.13 P3.14 R5.2 | length 15.3
  Top Layer w0.2: R5.2 81.756,85.694 84.551,85.694 P3.14 v1(85.852,85.725) P3.13@86.868,85.725 ; P3.13 P3.13@86.868,85.725 ; IC1.23 89.235,83.358 P3.13@86.868,85.725
SPIA_NSS: IC1.22 P3.15 P3.16 R4.2 | length 17.1
  Top Layer w0.2: R4.2 81.801,88.189 P3.16@84.582,88.189 ; P3.16 v1(85.852,88.265) P3.15 88.392,86.995 88.392,84.963 89.497,83.858 IC1.22
SPIA_SCK: IC1.24 P3.11 P3.12 R6.2 | length 14.2
  Top Layer w0.2: R6.2 P3.12@84.582,83.212 ; P3.12 P3.11 ; P3.11@87.122,83.212 88.165,83.212 88.519,82.858 IC1.24
  other v1: 85.852,83.185
TAD1_200: IC1.13 P1.1@100.433,90.221 | length 4.7
  Top Layer w0.3: IC1.13 99.028,86.333 100.146,87.45 100.146,87.571 v1(100.203,87.628)
  Bottom Layer w0.3: v1(100.203,87.628) 100.26,87.685 100.26,90.048 P1.1@100.433,90.221
TAD2_200: IC1.12 P2.1@104.902,90.221 | length 7.7
  Top Layer w0.254: IC1.12 100.979,85.358 v1(104.902,89.281)
  Bottom Layer w0.2: v1(104.902,89.281) P2.1@104.902,90.221
u_RST_RD: P3.17 P3.18 R1.1 R3.2 | length 9.1
  Top Layer w0.2: R3.2 81.846,90.685 P3.18@84.582,90.685 ; P3.18 v1(85.852,90.805) P3.17 88.888,92.571 R1.1
VDD: C10.2 C11.2 IC1.7 L1.1 | length 9.8
  Top Layer w0.3: L1.1 99.39,78.699 C10.2@100.253,79.562 ; IC1.7 100.003,82.858 100.003,79.811 C10.2@100.253,79.562 ; C11.2 C10.2 C10.2@100.253,79.562
VDD_A: C3.2 C4.2 IC1.14 | length 4.3
  Top Layer w0.3: IC1.14 98.528,87.823 98.887,88.182 99.037,88.332 C3.2 ; C3.2@99.254,88.332 C4.2
VDD_AM: C8.2 C9.2 IC1.6 | length 4.7
  Top Layer w0.3: C8.2 C9.2 98.121,79.689 99.028,80.596 IC1.6
VDD_D: C14.2 C15.2 IC1.5 | length 7.5
  Top Layer w0.3: C14.2 C15.2 94.529,79.689 95.231,80.391 97.79,80.391 98.528,81.129 IC1.5
VDD_DR: C6.2 C7.2 IC1.8 | length 7.7
  Top Layer w0.3: IC1.8 100.298,83.358 103.695,79.962 103.695,79.712 103.845,79.562 C7.2
XTI: C16.1 IC1.19 Y1.1 | length 7
  Top Layer w0.2: Y1.1@93.091,89.208 C16.1 ; Y1.1 93.331,88.819 93.68,88.819 93.98,88.519 93.98,86.487 95.105,85.362 95.775,85.362 IC1.19
XTO: C17.1 IC1.20 Y1.3 | length 7.1
  Top Layer w0.2: C17.1 91.722,88.078 Y1.3 91.806,88.019 94.967,84.858 IC1.20
pads on no net: CN1. CN1.3 CN1.9 CN1.13 CN1.14 IC2.1 IC2.2 IC2.3 IC2.4 IC2.8 IC2.9 P1.1@100.433,91.821 P2.1@104.902,91.821 U1.4 U3.4 Y1.2 Y1.4
copper on no net:
  other v1: 85.852,69.638 85.852,71.332 85.852,72.178 85.852,73.872 85.852,74.718 85.852,76.412 85.852,77.258 85.852,78.952 85.852,79.798 85.852,81.492 85.852,82.338 85.852,84.032 85.852,84.878 85.852,86.572 85.852,87.418 85.852,89.112 85.852,89.958 85.852,91.652 85.852,95.038 85.852,96.732 85.852,97.578 85.852,99.272
  other v3: 138.187,82.017 134.529,85.674

## Polygon pours and split planes (outlines as drawn)
GND on Top Layer "GND_L01_P002" (solid, remove dead copper, pour order 2): 52.07,99.949 52.197,100.076 83.058,100.076 83.058,68.58 82.931,68.707 52.07,68.707
GND on Top Layer "GND_L01_P003" (solid, remove dead copper, pour order 3): 88.773,99.822 88.9,99.949 115.57,99.949 115.57,68.58 88.773,68.58
GND on Bottom Layer "GND_L02_P000" (solid, remove dead copper, pour order 0): 52.07,99.949 52.197,100.076 83.058,100.076 83.058,68.58 82.931,68.707 52.07,68.707
GND on Bottom Layer "GND_L02_P001" (solid, remove dead copper, pour order 1): 88.773,99.822 88.9,99.949 115.57,99.949 115.57,68.58 88.773,68.58

## Keep-outs
Keep-Out Layer:
  the board outline again, w0.6

## Silkscreen, mask and mechanical layers (free items; w line width, h text height)
Top Overlay:
  text "STM32C071EVK" at 65.913,92.357 h3
  text "WTmec" at 103.288,91.044 h3.8
  text "WTmec" at 53.631,75.169 h3.8
  text "ST25R100EVK" at 90.424,69.878 h3
Bottom Overlay:
  text "E" at 114.046,86.36 h10
  text "S" at 81.661,85.979 h8
  text "C" at 97.79,85.852 h9
  text "J" at 71.882,85.09 h15
  text "I" at 113.538,76.962 h11
  text "F" at 81.661,75.747 h11.5
  text "G" at 70.612,75.565 h11
  text "H" at 101.6,74.041 h18

## Dimensions
52.07,99.949 to 52.07,68.707 on Top Overlay
52.07,99.949 to 141.986,99.949 on Top Overlay

## Text inside footprints (layer, text, board x,y; h text height)
P3: Top Overlay "24" at 85.09,99.949 h1.27 r90; Top Overlay "23" at 87.63,99.949 h1.27 r90; Top Overlay "2" at 85.09,67.945 h1.27 r90; Top Overlay "1" at 87.63,67.945 h1.27 r90